# Altium PCB DC-DC_BUCK-BOOST.PcbDoc (part 1 of 3)
Units mm, origin at the board's own origin, x right, y up, seen from the top; angles counter-clockwise.
Board outline 250 x 400 mm, 4 copper layers (Top Layer 1, Top Layer, Bottom Layer, Bottom Layer 1), stack 0.603 mm thick; 332 components, 145 nets, 884 pads, 70 vias.
Unrouted connection lines stored in the file: 20.
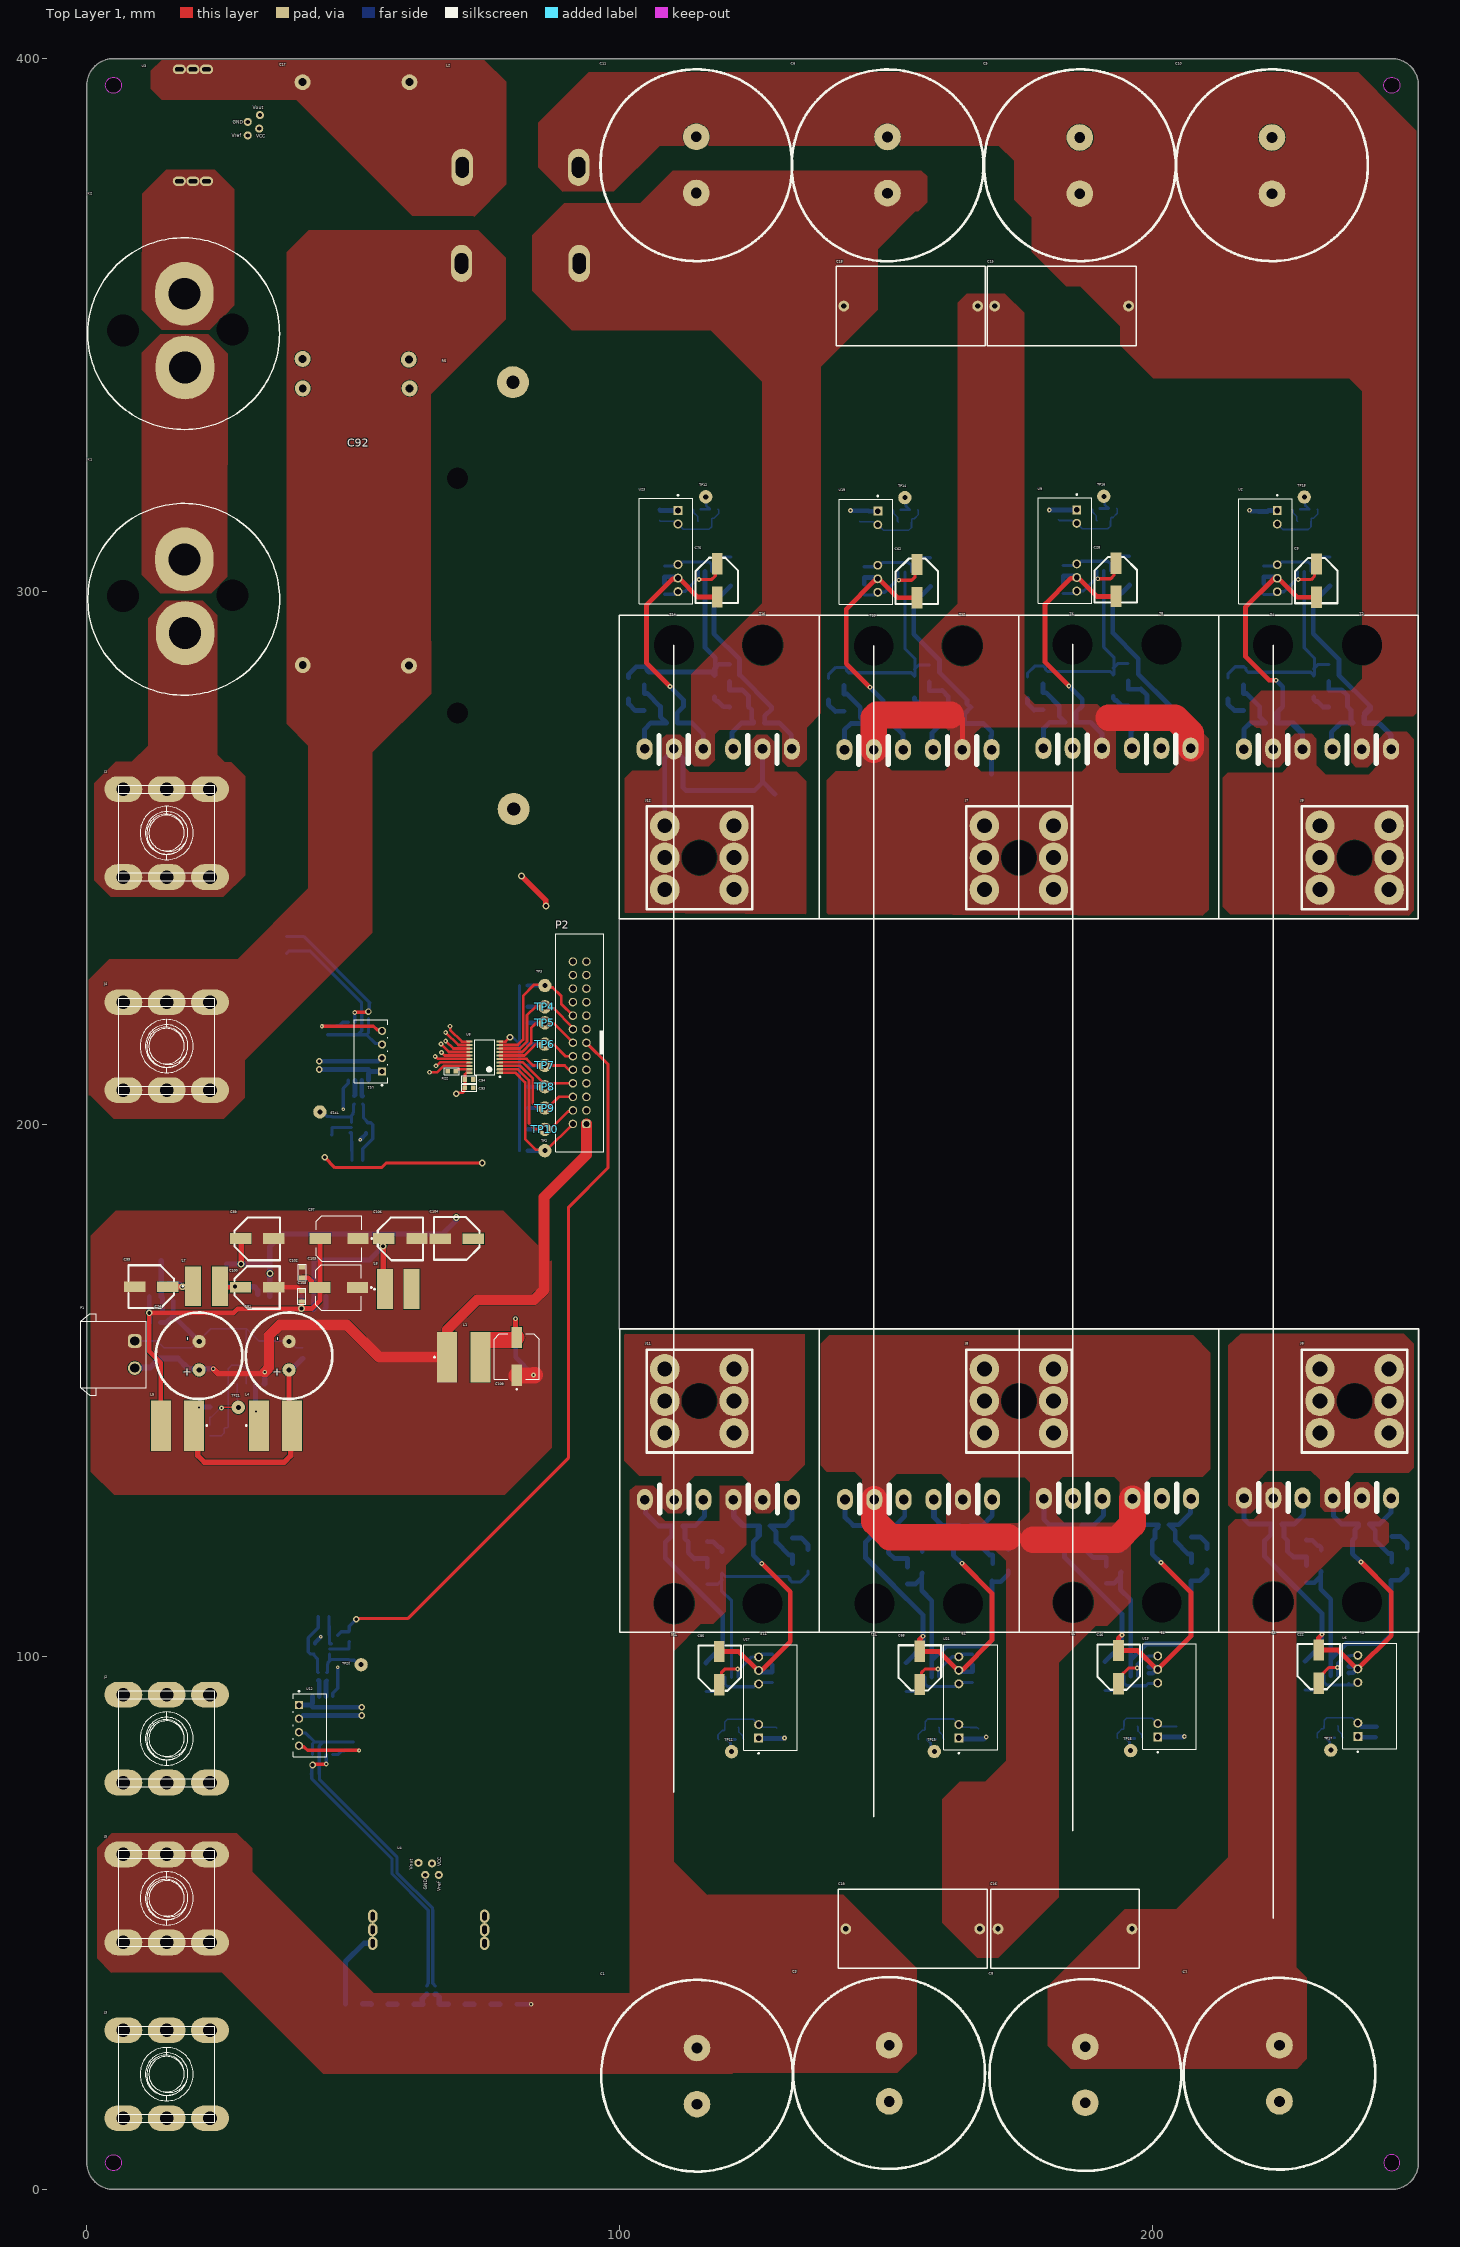
[diagram p0: Top Layer 1 view]
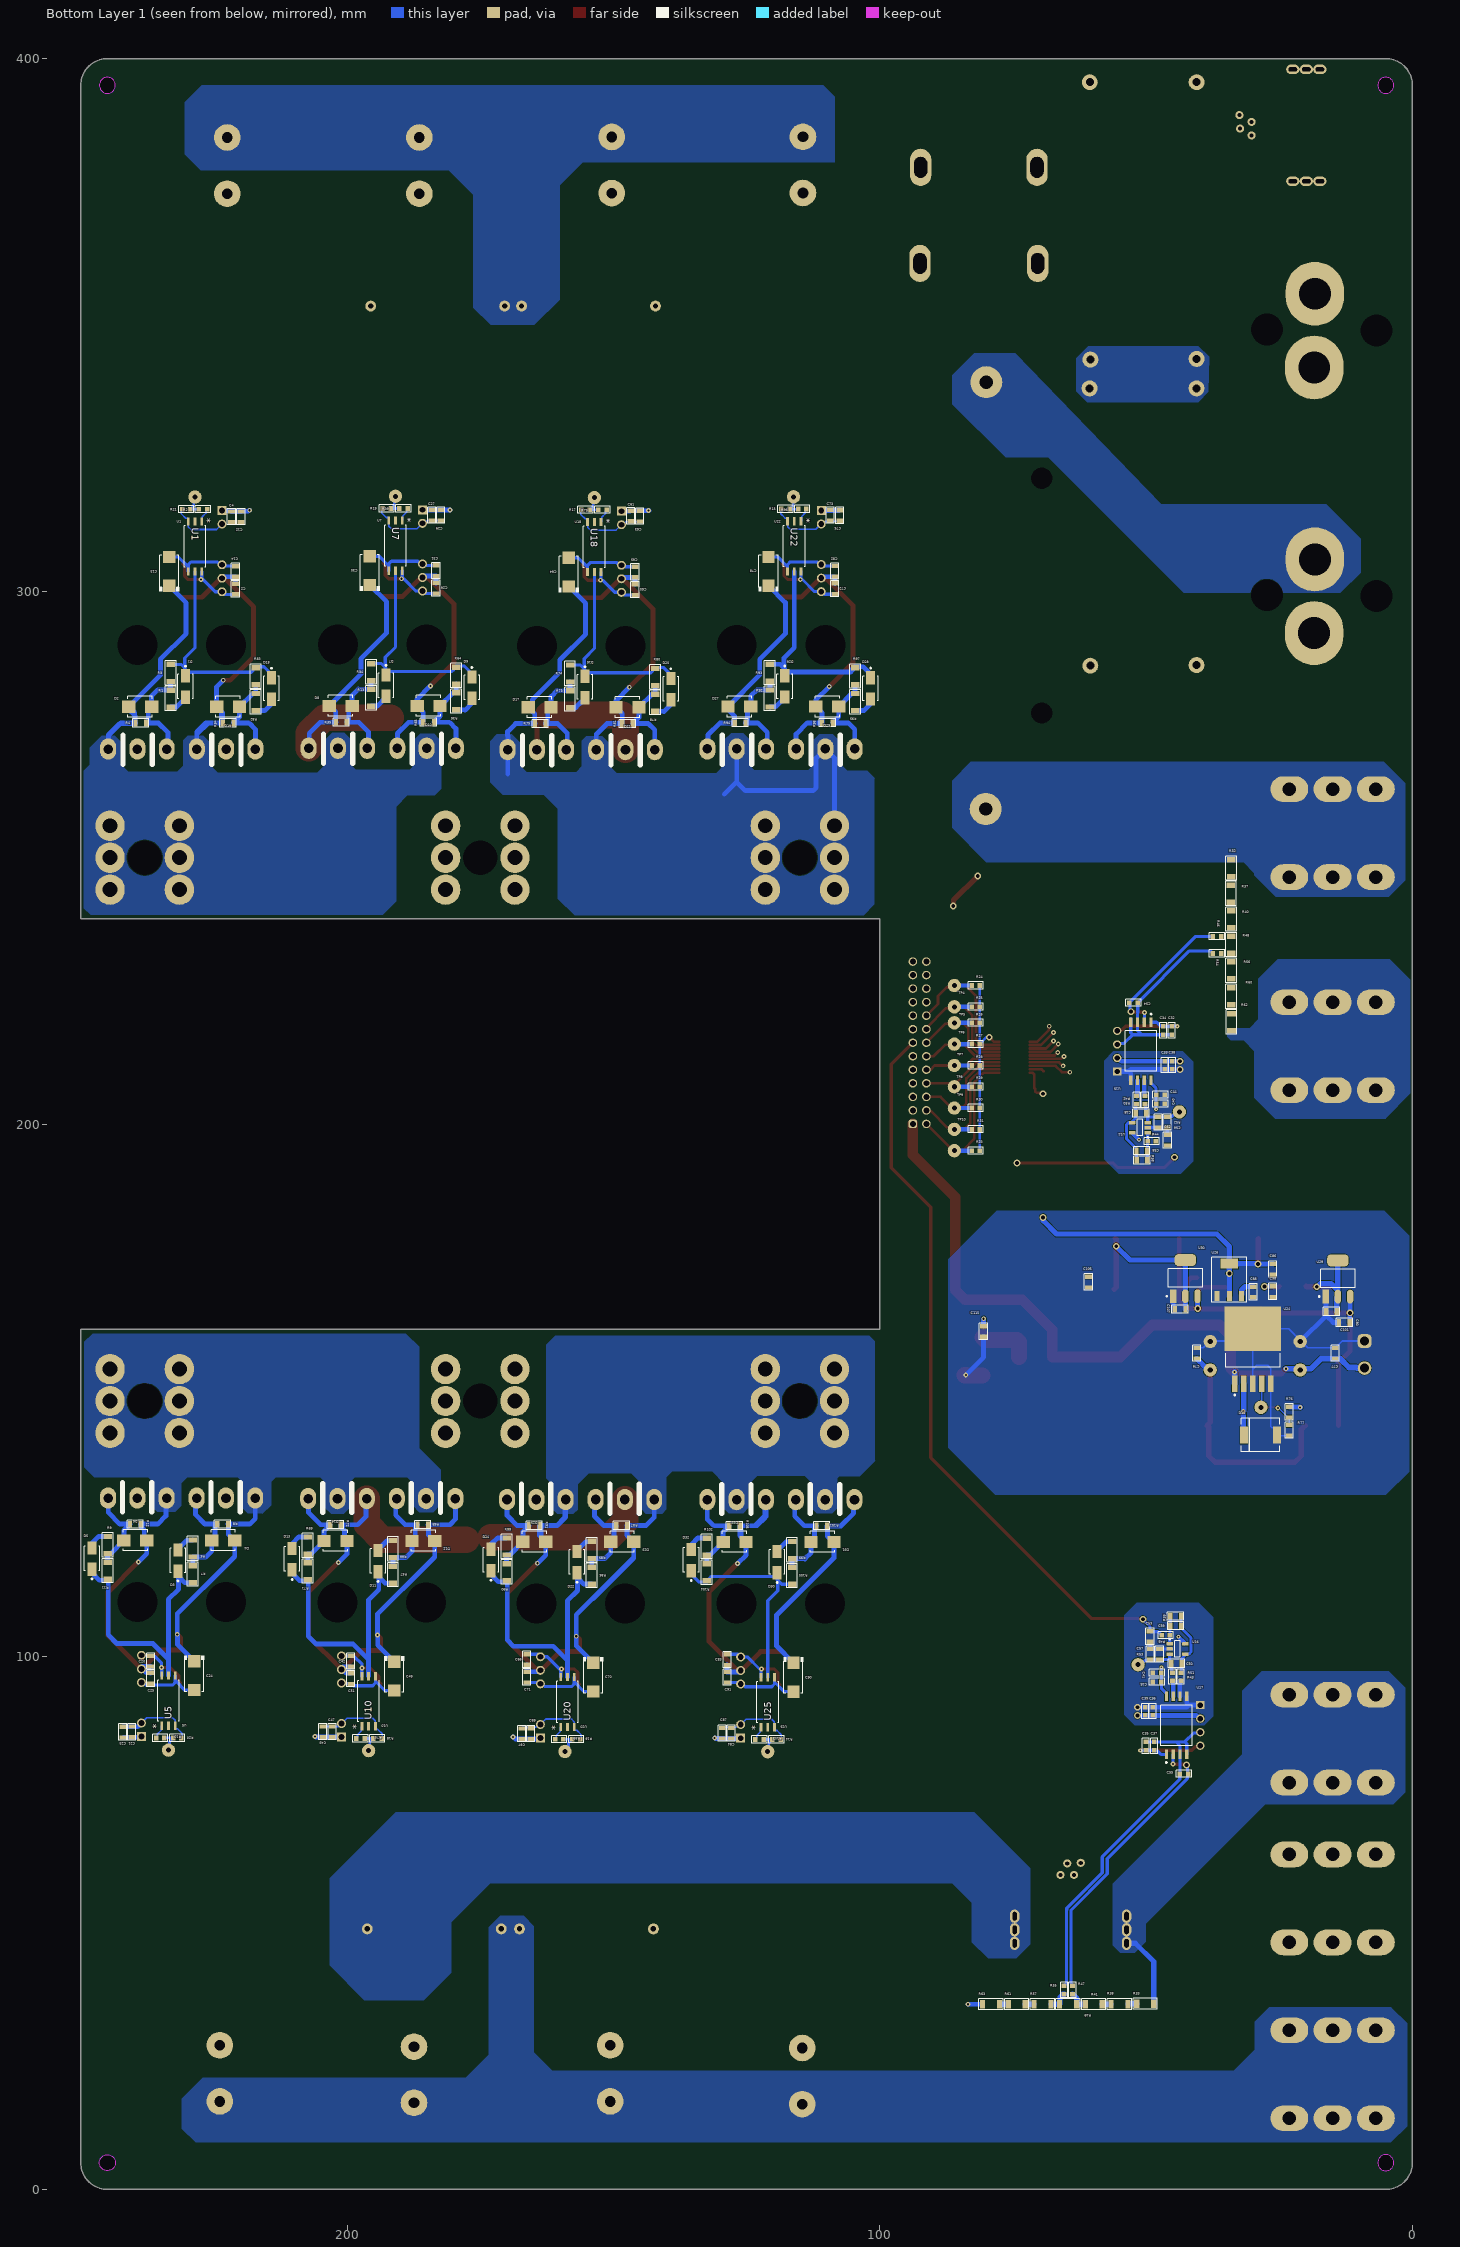
[diagram p1: Bottom Layer 1 view, seen from below]
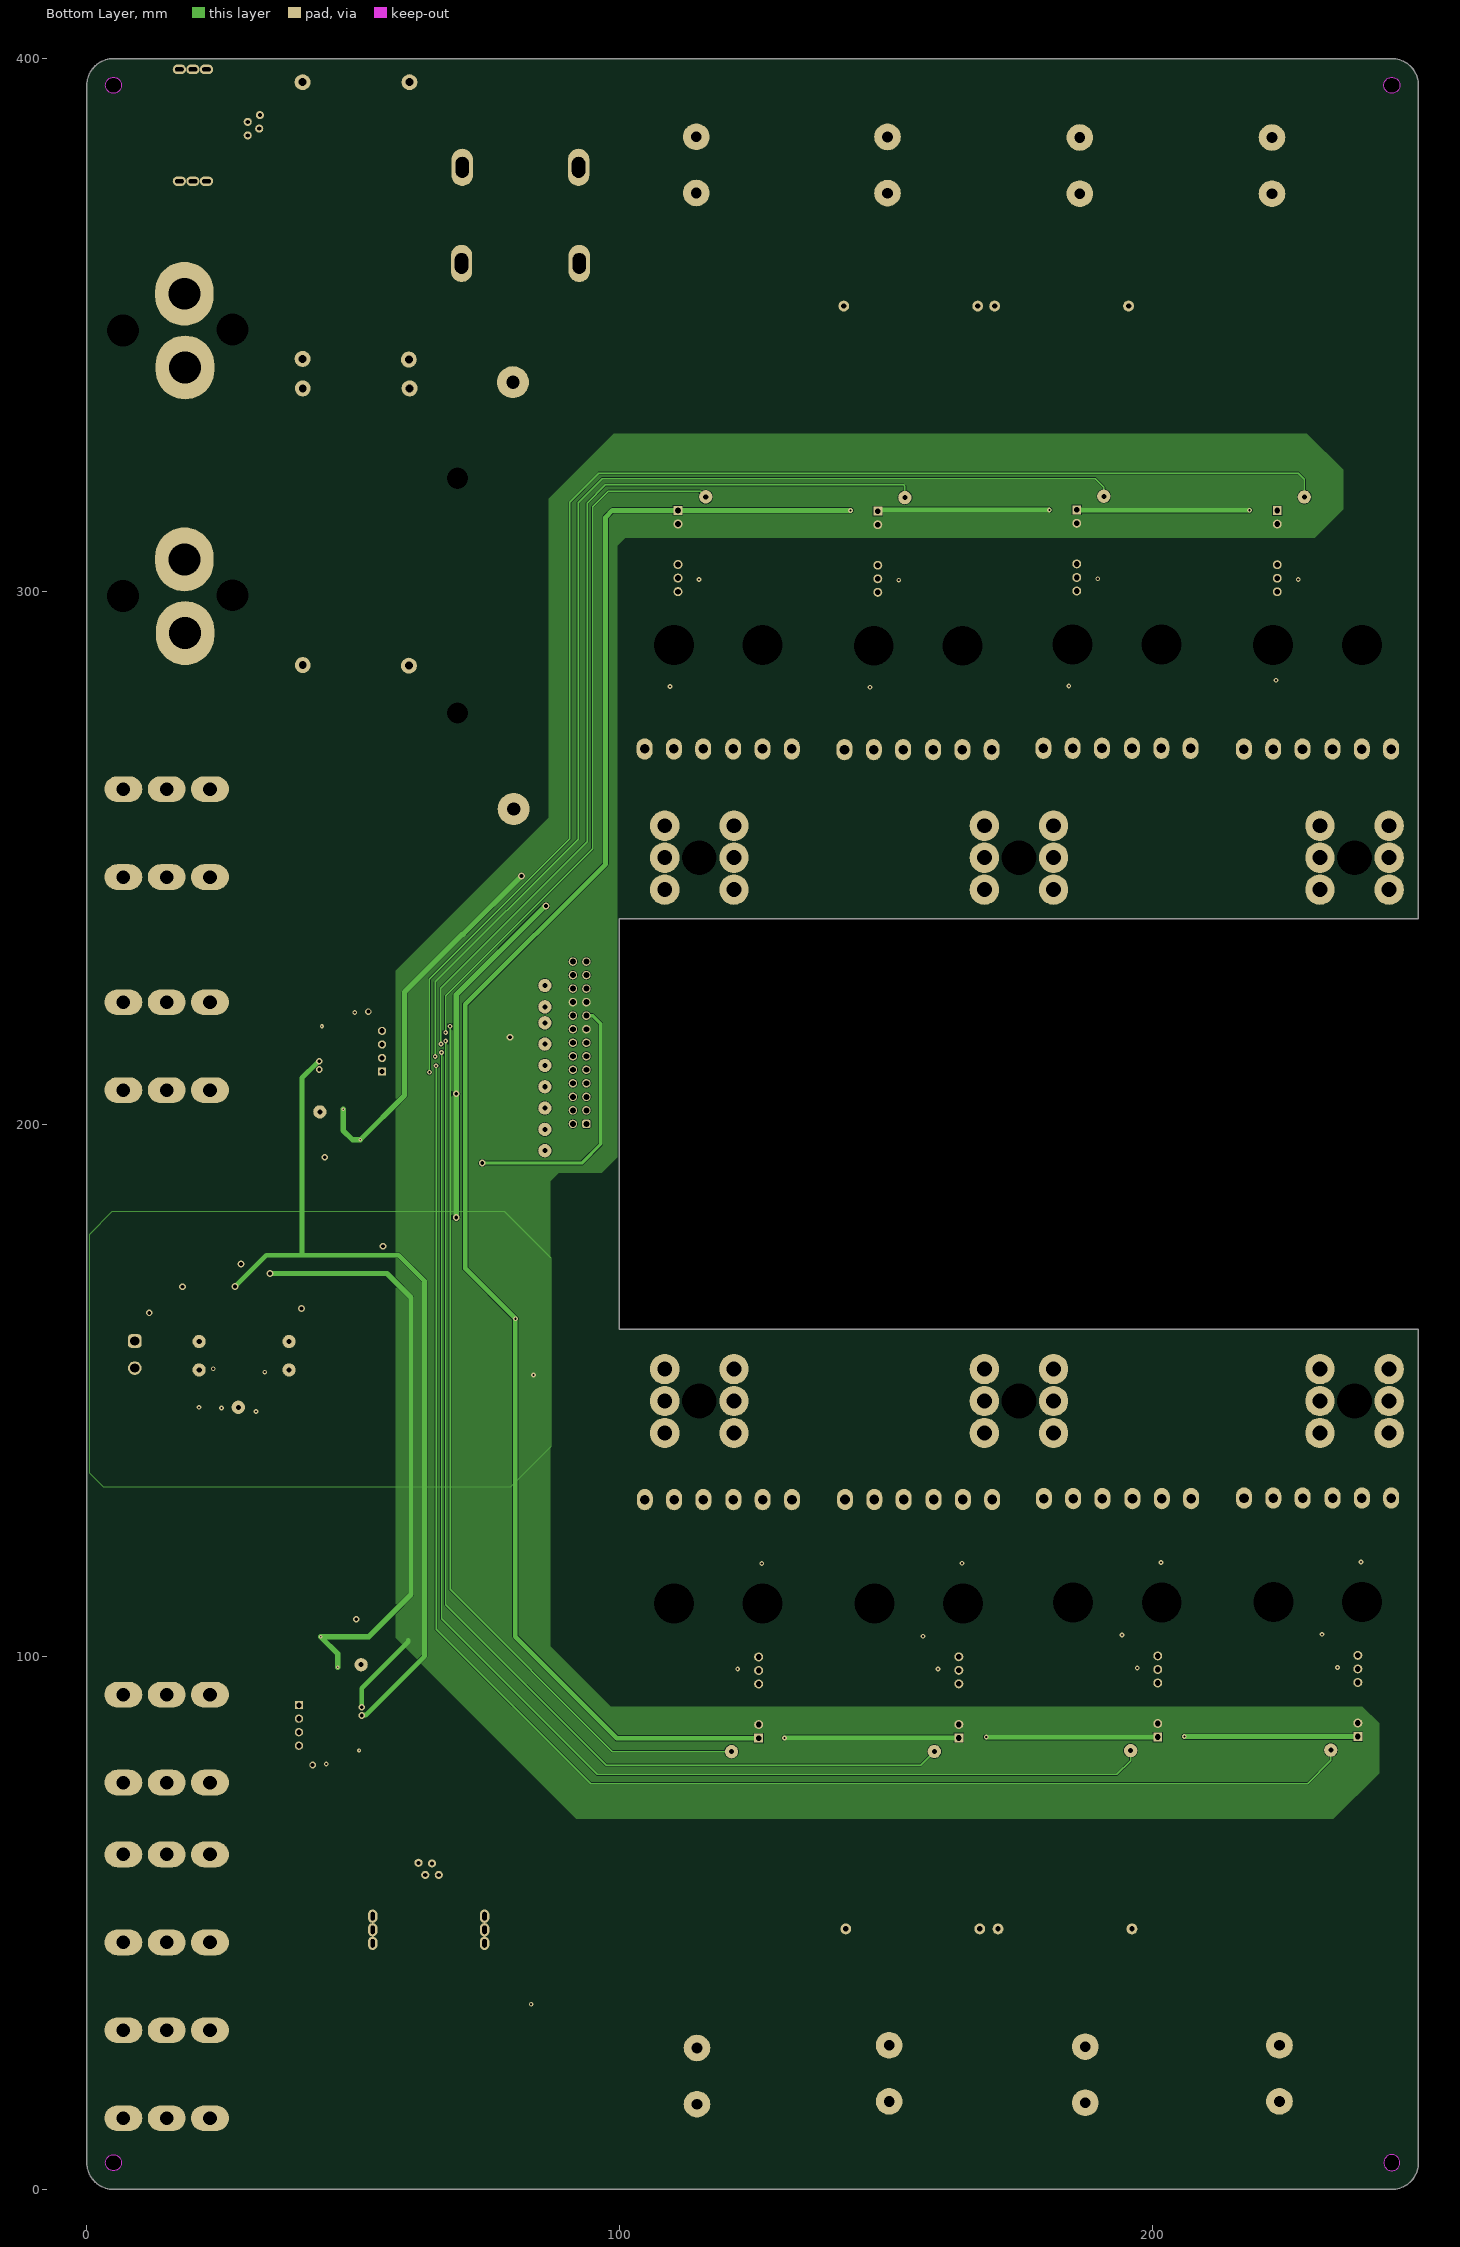
[diagram p2: Bottom Layer]
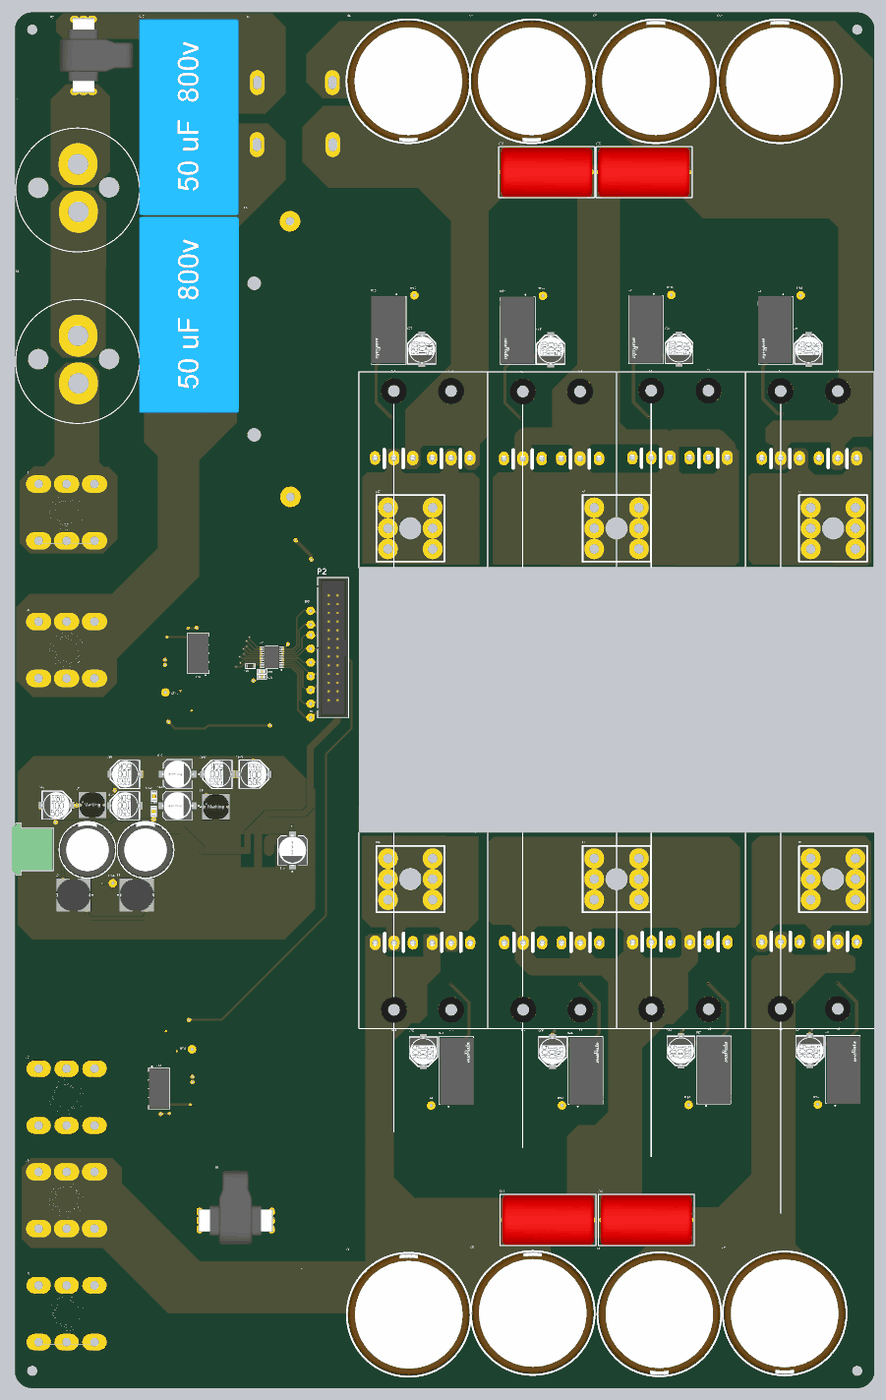
[diagram p5: 3D render of the assembled board from above, using the file's embedded part models]
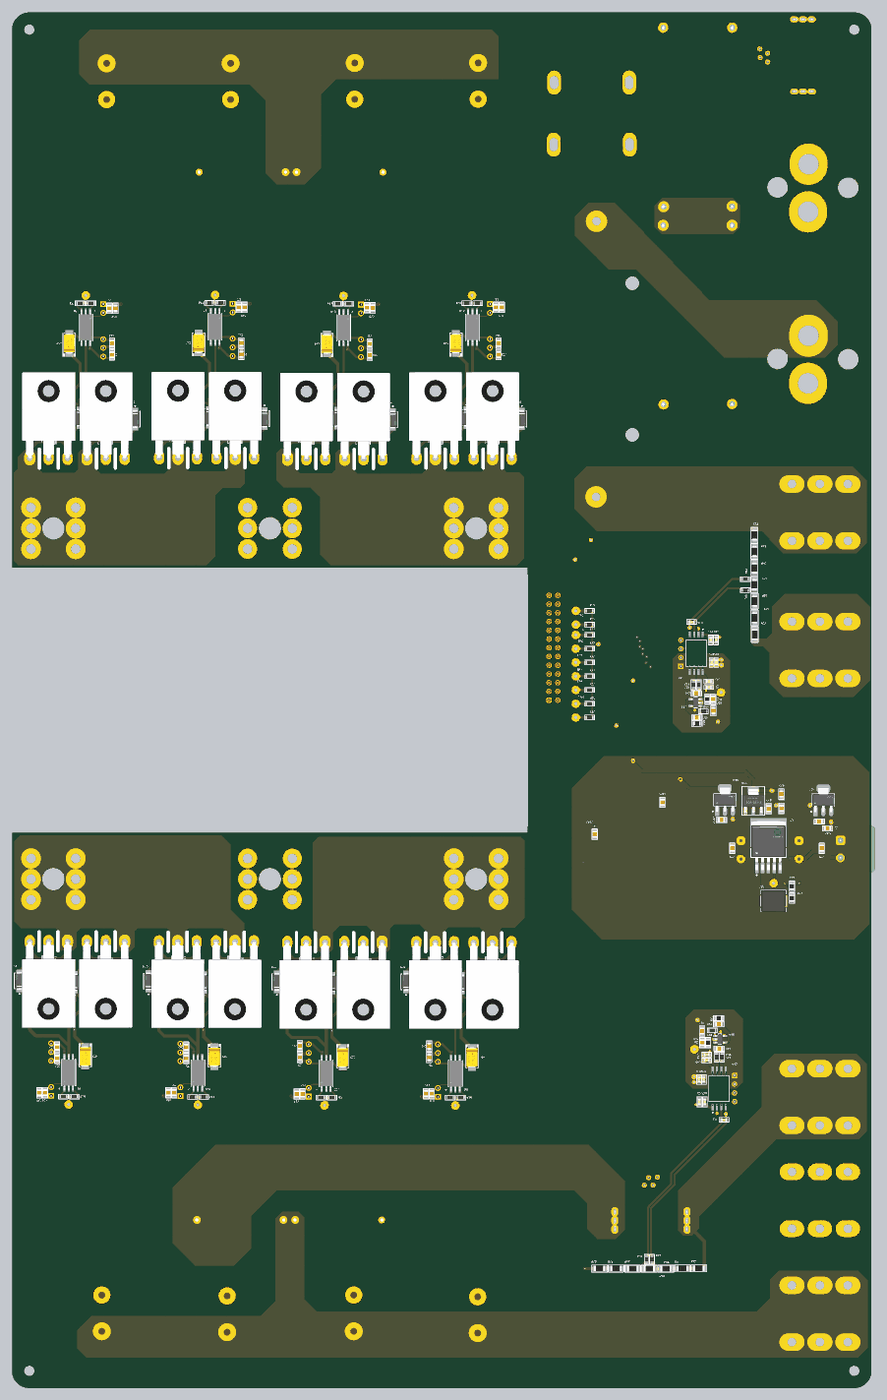
[diagram p6: 3D render of the assembled board from below, using the file's embedded part models]

## Layer stack, top to bottom
Top Solder: solder mask 0.0102, Solder Resist, Dk 3.5
Top Layer 1: signal copper 0.035
Dielectric 2: prepreg 0.0711, PP-006, Dk 4.1
Top Layer: signal copper 0.0356
Dielectric 1: dielectric 0.32, FR-4, Dk 4.8
Bottom Layer: signal copper 0.0356
Dielectric 3: prepreg 0.0711, PP-006, Dk 4.1
Bottom Layer 1: signal copper 0.035
Bottom Solder: solder mask 0.0102, Solder Resist, Dk 3.5

## Board outline
5.006,0.006 cw(c5.006,5.006) 0.006,5.006 0.006,395.006 cw(c5.006,395.006) 5.006,400.006 245.006,400.006 cw(c245.006,395.006) 250.006,395.006 250.006,238.506 100.006,238.506 100.006,161.506 250.006,161.506 250.006,5.006 cw(c245.006,5.006) 245.006,0.006
cut-out: 245.006,393.506 cw(c245.006,395.006) 243.506,395.006 cw(c245.006,395.006) 245.006,396.506 cw(c245.006,395.006) 246.506,395.006 cw(c245.006,395.006)
cut-out: 5.006,393.506 cw(c5.006,395.006) 3.506,395.006 cw(c5.006,395.006) 5.006,396.506 cw(c5.006,395.006) 6.506,395.006 cw(c5.006,395.006)
cut-out: 243.506,5.006 ccw(c245.006,5.006) 245.006,3.506 ccw(c245.006,5.006) 246.506,5.006 ccw(c245.006,5.006) 245.006,6.506 ccw(c245.006,5.006)
cut-out: 5.006,3.506 cw(c5.006,5.006) 3.506,5.006 cw(c5.006,5.006) 5.006,6.506 cw(c5.006,5.006) 6.506,5.006 cw(c5.006,5.006)

## Design rules (kind name [scope] priority, off if disabled: settings)
Clearance [All] p1: gap=0.1 ignorepadtopadclearanceinfootprint=FALSE
DiffPairsRouting [All] p1: maxlimit=0.254 minlimit=0.254 mostfreqgap=0.254 toplayer_minwidth=0.381 toplayer_maxwidth=0.9 toplayer_prefwidth=0.7 midlayer1_minwidth=0.381 midlayer1_maxwidth=0.381 midlayer1_prefwidth=0.381 midlayer2_minwidth=0.381 midlayer2_maxwidth=0.381 midlayer2_prefwidth=0.381 bottomlayer_minwidth=0.381 bottomlayer_maxwidth=0.9 bottomlayer_prefwidth=0.7 maxuncoupledlength=70
Height [All] p1: minheight=0 maxheight=60 prefheight=30
PlaneConnect [All] p1: planeconnectstyle=Direct reliefexpansion=0.508 reliefentries=4 reliefconductorwidth=0.254 reliefairgap=0.254
PolygonConnect [All] p1: connectstyle=Direct reliefconductorwidth=0.254 reliefentries=4 polygonreliefangle="90 Angle" airgapwidth=0.254
RoutingVias [All] p1: holewidth=0.711 width=1.27 viastyle="Through Hole" minholewidth=0.711 minwidth=1.27 maxholewidth=0.711 maxwidth=1.27
SolderMaskExpansion [All] p1: expansion=0.102 istentingtop=FALSE
SupplyNets "Schematic Supply Nets_9" [InNet('+5V_1')] p1: voltage=0.000
SupplyNets "Schematic Supply Nets_8" [InNet('VCC')] p2: voltage=0.000
SupplyNets "Schematic Supply Nets_7" [InNet('GND')] p3: voltage=0.000
SupplyNets "Schematic Supply Nets_6" [InNet('+5')] p4: voltage=0.000
SupplyNets "Schematic Supply Nets_5" [InNet('+8VDC')] p5: voltage=0.000
SupplyNets "Schematic Supply Nets_4" [InNet('+3V3')] p6: voltage=0.000
SupplyNets "Schematic Supply Nets_3" [InNet('+5V')] p7: voltage=0.000
SupplyNets "Schematic Supply Nets_2" [InNet('+12')] p8: voltage=0.000
Width [All] p1: maxlimit=5 minlimit=0.254 preferedwidth=0.5 toplayer_minwidth=0.3 midlayer1_maxwidth=0.254 midlayer1_prefwidth=0.254 midlayer2_prefwidth=0.254 bottomlayer_minwidth=0.3 minimp=50.000000 maximp=50.000000 favimp=50.000000 checkconnectedcopper=TRUE
27 further rules are at their usual default settings.

## Components (designator, comment, footprint, x,y, rotation, side; value= is the part's Value field where it differs from the comment)
C1 "550V_470uF" 500V_470uF 114.554,21.336 r90 top
C2 "0.1uF" CAP-0805 220.949,300.437 r270 bottom
C3 "550V_470uF" 500V_470uF 150.622,21.844 r90 top
C4 "0.01uF" CAP-0805 221.7,314 r90 bottom
C5 "550V_470uF" 500V_470uF 186.436,380 r90 top
C6 "550V_470uF" 500V_470uF 150.325,379.975 r270 top
C7 "550V_470uF" 500V_470uF 223.901,21.717 r270 top
C8 "550V_470uF" 500V_470uF 187.452,21.463 r270 top
C9 "100uF_50V" CAP_SMD_Size_E 230.855,301.961 r90 top
C10 "550V_470uF" 500V_470uF 222.504,380 r90 top
C11 "550V_470uF" 500V_470uF 114.427,380 r270 top
C12 "2.2uF" CAP-0805 219.925,314 r270 bottom
C13 "16V_47uF" CAP-TAN-C 233.395,303.739 r90 bottom
C14 "0.1uF" CAP-0805 220.949,303.739 r270 bottom
C15 "4.7uF_630V" CAP_4.7uF_630V 183.007,353.568 r0 top
C16 "CAP-NON-POLAR" CAP_4.7uF_630V 183.642,48.895 r0 top
C17 "CAP-NON-POLAR" "Z121578672 77G" 50.55,369.55 r90 top
C18 "CAP-NON-POLAR" CAP_4.7uF_630V 154.686,353.568 r0 top
C19 "CAP-NON-POLAR" CAP_4.7uF_630V 155.067,48.895 r0 top
C20 "0.1uF" CAP-0805 236.9,99.15 r90 bottom
C21 "0.01uF" CAP-0805 240.4,85.875 r270 bottom
C22 "100uF_50V" CAP_SMD_Size_E 231.257,98.215 r270 top
C23 "2.2uF" CAP-0805 242.125,85.85 r270 bottom
C24 "16V_47uF" CAP-TAN-C 228.717,96.437 r270 bottom
C25 "0.1uF" CAP-0805 236.9,95.925 r90 bottom
C26 "0.1uF" CAP-0805 183.307,300.579 r270 bottom
C27 "0.01uF" CAP-0805 184.125,314.275 r90 bottom
C28 "100uF_50V" CAP_SMD_Size_E 193.213,302.103 r90 top
C29 "2.2uF" CAP-0805 182.4,314.275 r270 bottom
C30 "16V_47uF" CAP-TAN-C 195.753,303.881 r90 bottom
C31 "0.1uF" CAP-0805 183.307,303.881 r270 bottom
C32 "100nF" CAP-0603 45.21,217.551 r90 bottom
C33 "0.01uF" CAP-0603 46.507,211.026 r90 bottom
C34 "1uF" CAP-0603 46.785,217.551 r90 bottom
C35 "100nF" CAP-0603 50.05,83.225 r270 bottom
C36 "0.01uF" CAP-0603 48.753,89.75 r270 bottom
C37 "1uF" CAP-0603 48.475,83.225 r270 bottom
C38 "2.2uF" CAP-0603 45.11,211.026 r90 bottom
C39 "2.2uF" CAP-0603 50.15,89.75 r270 bottom
C40 "0.01uF" CAP-0603 47.31,203.801 r0 bottom
C41 "0.01uF" CAP-0603 47.95,96.975 r180 bottom
C42 "0.1uF" CAP-0805 199.35,99.125 r90 bottom
C43 "0.01uF" CAP-0805 204.575,85.9 r270 bottom
C44 "2.2uF" CAP-0603 47.31,205.501 r0 bottom
C45 "2.2uF" CAP-0603 47.95,95.275 r180 bottom
C46 "100uF_50V" CAP_SMD_Size_E 193.683,98.115 r270 top
C47 "2.2uF" CAP-0805 202.825,85.9 r90 bottom
C48 "1nF" CAP-0805 50.96,202.051 r180 bottom
C49 "16V_47uF" CAP-TAN-C 191.143,96.337 r270 bottom
C50 "1nF" CAP-0805 44.3,98.725 r0 bottom
C51 "0.1uF" CAP-0805 199.35,95.875 r90 bottom
C52 "10nF" CAP-0805 45.985,196.976 r270 bottom
C53 "10nF" CAP-0805 49.275,103.8 r90 bottom
C54 "4.7nF" CAP-0603 52.36,222.776 r0 bottom
C55 "4.7nF" CAP-0603 42.9,78 r180 bottom
C56 "470pF" CAP-0805 46.035,200.326 r90 bottom
C57 "470pF" CAP-0805 49.225,100.45 r270 bottom
C58 "470pF" CAP-0805 50.81,194.951 r0 bottom
C59 "470pF" CAP-0805 44.45,105.825 r180 bottom
C60 "0.1uF" CAP-0805 145.964,300.327 r270 bottom
C61 "0.01uF" CAP-0805 146.775,314.15 r90 bottom
C62 "100uF_50V" CAP_SMD_Size_E 155.87,301.851 r90 top
C63 "2.2uF" CAP-0805 145.05,314.125 r270 bottom
C64 "16V_47uF" CAP-TAN-C 158.41,303.629 r90 bottom
C65 "0.1uF" CAP-0805 145.964,303.629 r270 bottom
C66 "0.1uF" CAP-0805 166.258,99.474 r90 bottom
C67 "0.01uF" CAP-0805 167.25,85.525 r270 bottom
C68 "100uF_50V" CAP_SMD_Size_E 156.352,97.95 r270 top
C69 "2.2uF" CAP-0805 165.525,85.55 r90 bottom
C70 "16V_47uF" CAP-TAN-C 153.812,96.172 r270 bottom
C71 "0.1uF" CAP-0805 166.258,96.172 r90 bottom
C72 "0.1uF" CAP-0805 108.475,300.5 r270 bottom
C73 "0.01uF" CAP-0805 109.275,314.275 r90 bottom
C74 "25V_1000uF" "HITANO 3300uF 25V  16x25" 21.082,156.5 r90 top
C75 "100uF_50V" CAP_SMD_Size_E 118.349,301.985 r90 top
C76 "2.2uF" CAP-0805 107.55,314.25 r270 bottom
C77 "1uF" CAP-0805 14.478,156.976 r270 bottom
C78 "16V_47uF" CAP-TAN-C 120.889,303.763 r90 bottom
C79 "0.1uF" CAP-0805 40.513,156.976 r270 bottom
C80 "0.1uF" CAP-0805 12.775,162.75 r180 bottom
C81 "25V_1000uF" "HITANO 3300uF 25V  16x25" 37.973,156.5 r90 top
C82 "0.1uF" CAP-0805 108.443,303.763 r270 bottom
C83 "0.1uF" CAP-0805 128.666,99.445 r90 bottom
C84 "0.01uF" CAP-0805 127.875,85.625 r270 bottom
C85 "100uF_50V" CAP_SMD_Size_E 118.76,97.921 r270 top
C86 "0.1uF" CAP-0805 26.225,172.725 r90 bottom
C87 "2.2uF" CAP-0805 129.6,85.625 r90 bottom
C88 "0.1uF" CAP-0805 29.9,168.475 r90 bottom
C89 "1000uF 6.3V" CAP_SMD_Size_E 32.075,178.5 r180 top
C90 "16V_47uF" CAP-TAN-C 116.22,96.143 r270 bottom
C91 "0.1uF" CAP-0805 128.666,96.143 r90 bottom
C92 "CAP-NON-POLAR" "Z121578672 77G" 50.575,312.075 r90 top
C93 "0.01uF" CAP-0603 71.775,206.8 r180 top
C94 "2.2uF" CAP-0603 71.775,208.35 r180 top
C97 "1000uF 10V" CAP_SMD_Size_G 47.35,178.5 r180 top
C98 "0.1uF" CAP-0805 26.2,168.55 r90 bottom
C99 "1000uF 6.3V" CAP_SMD_Size_E 12.023,169.425 r0 top
C100 "1000uF 6.3V" CAP_SMD_Size_E 32.025,169.375 r180 top
C101 "0.1uF" CAP-0805 15.2,164.8 r180 bottom
C102 "0.1uF" CAP-0805 40.425,172.125 r270 top
C103 "1000uF 10V" CAP_SMD_Size_G 47.275,169.325 r180 top
C104 "1000uF 6.3V" CAP_SMD_Size_E 69.4,178.45 r0 top
C105 "0.1uF" CAP-0805 60.825,170.325 r90 bottom
C106 "1000uF 6.3V" CAP_SMD_Size_E 58.95,178.5 r180 top
C107 "0.1uF" CAP-0805 43.625,165.225 r180 bottom
C108 "0.1uF" CAP-0805 40.35,167.675 r270 top
C109 "330uF 25V" CAP_SMD_Size_G 80.7,156.375 r90 top
C110 "1uF" CAP-0805 80.525,161.05 r90 bottom
D1 "US1G" US1G_SMA 230.347,282.149 r270 bottom
D2 "SMBJ15CA-TR" FP-SMB-CA-MFG 238.856,278.339 r180 bottom
D3 "US1G" US1G_SMA 231.765,118.027 r90 bottom
D4 "SMBJ15CA-TR" FP-SMB-CA-MFG 223.256,121.837 r0 bottom
D5 "US1G" US1G_SMA 247.894,118.408 r90 bottom
D6 "SMBJ15CA-TR" FP-SMB-CA-MFG 239.757,121.837 r0 bottom
D7 "US1G" US1G_SMA 192.705,282.291 r270 bottom
D8 "SMBJ15CA-TR" FP-SMB-CA-MFG 201.214,278.481 r180 bottom
D9 "US1G" US1G_SMA 176.576,281.91 r270 bottom
D10 "SMBJ15CA-TR" FP-SMB-CA-MFG 184.713,278.481 r180 bottom
D11 "US1G" US1G_SMA 194.191,117.927 r90 bottom
D12 "SMBJ15CA-TR" FP-SMB-CA-MFG 185.682,121.737 r0 bottom
D13 "US1G" US1G_SMA 210.32,118.308 r90 bottom
D14 "SMBJ15CA-TR" FP-SMB-CA-MFG 202.183,121.737 r0 bottom
D15 "SS36" SMC/DO214AB 28.505,141.609 r180 bottom
D16 "US1G" US1G_SMA 155.362,282.039 r270 bottom
D17 "SMBJ15CA-TR" FP-SMB-CA-MFG 163.871,278.229 r180 bottom
D18 "US1G" US1G_SMA 214.218,281.768 r270 bottom
D19 "SMBJ15CA-TR" FP-SMB-CA-MFG 222.355,278.339 r180 bottom
D20 "US1G" US1G_SMA 139.233,281.658 r270 bottom
D21 "SMBJ15CA-TR" FP-SMB-CA-MFG 147.37,278.229 r180 bottom
D22 "US1G" US1G_SMA 156.86,117.762 r90 bottom
D23 "SMBJ15CA-TR" FP-SMB-CA-MFG 148.351,121.572 r0 bottom
D24 "US1G" US1G_SMA 172.989,118.143 r90 bottom
D25 "SMBJ15CA-TR" FP-SMB-CA-MFG 164.852,121.572 r0 bottom
D26 "US1G" US1G_SMA 117.841,282.173 r270 bottom
D27 "SMBJ15CA-TR" FP-SMB-CA-MFG 126.35,278.363 r180 bottom
D28 "US1G" US1G_SMA 101.712,281.792 r270 bottom
D29 "SMBJ15CA-TR" FP-SMB-CA-MFG 109.849,278.363 r180 bottom
D30 "US1G" US1G_SMA 119.268,117.733 r90 bottom
D31 "SMBJ15CA-TR" FP-SMB-CA-MFG 110.759,121.543 r0 bottom
D32 "US1G" US1G_SMA 135.397,118.114 r90 bottom
D33 "SMBJ15CA-TR" FP-SMB-CA-MFG 127.26,121.543 r0 bottom
J1 "18 * 18MM 180A PCB" "M8 Conn" 15,255 r0 top locked
J2 "18 * 18MM 180A PCB" "M8 Conn" 15,85 r0 top locked
J3 "18 * 18MM 180A PCB" "M8 Conn" 15,22 r0 top locked
J4 "18 * 18MM 180A PCB" "M8 Conn" 15,215 r0 top locked
J5 "18 * 18MM 180A PCB" "M8 Conn" 15,55 r0 top locked
J6 "M5" M5_Conn 238,148 r0 top locked
J7 "M5" M5_Conn 175,250 r0 top locked
J8 "M5" M5_Conn 175,148 r0 top locked
J9 "M5" M5_Conn 238,250 r0 top locked
J11 "M5" M5_Conn 115,148 r0 top locked
J12 "M5" M5_Conn 115,250 r0 top locked
K1 "SEV30ADXL" Relay_1000VDC_30A 18.96,293.427 r0 top
K2 "SEV30ADXL" Relay_1000VDC_30A 18.95,343.3 r0 top
L1 "100uH CD105" WE-PD2_1054#1 1340.775,1426.25 r0 top
L2 "Drossel" T47x27x15 89.408,370.586 r90 top
L4 "100uH CD105" WE-PD2_1054#2 35.433,143.387 r0 top
L5 "100uH CD105" WE-PD2_1054#2 17.018,143.387 r180 top
L7 "220uH CD75" WE-PD2_7850 22.479,169.549 r0 top
L8 "220uH CD75" WE-PD2_7850 58.475,169 r0 top
P1 "691305540002" 691305540002 5,156.722 r270 top locked
P2 "61202621621" 61202621621 92.53,215.265 r90 top
R1 "5" RES-1206 233.141,279.863 r270 bottom
R2 "150" RES-0603 227.045,315.423 r180 bottom
R3 "10" RES-1206 233.141,284.689 r90 bottom
R4 "1K" RES-0805 238.729,275.291 r0 bottom
R5 "100" RES_100W_Aluminium 80,299.275 r90 top
R6 "5" RES-1206 228.971,120.313 r90 bottom
R7 "10" RES-1206 228.971,115.487 r270 bottom
R8 "1K" RES-0805 223.383,124.885 r180 bottom
R9 "5" RES-1206 244.968,120.96 r90 bottom
R10 "150" RES-0603 235.067,84.753 r0 bottom
R11 "10" RES-1206 244.968,116.134 r270 bottom
R12 "1K" RES-0805 239.766,124.885 r180 bottom
R13 "5" RES-1206 195.499,280.005 r270 bottom
R14 "10K" RES-0603 119.395,84.459 r0 bottom
R15 "10K" RES-0603 117.714,315.447 r180 bottom
R16 "10K" RES-0603 156.987,84.488 r0 bottom
R17 "10K" RES-0603 155.235,315.313 r180 bottom
R18 "10K" RES-0603 194.318,84.653 r0 bottom
R19 "10K" RES-0603 192.578,315.565 r180 bottom
R20 "10K" RES-0603 231.892,84.753 r0 bottom
R21 "10K" RES-0603 230.22,315.423 r180 bottom
R22 "10K" RES-0603 68.5,209.925 r0 top
R23 "10K" RES-0603 82,195 r0 bottom locked
R24 "10K" RES-0603 82,226 r0 bottom locked
R25 "10K" RES-0603 82,222 r0 bottom locked
R26 "10K" RES-0603 82,219 r0 bottom locked
R27 "10K" RES-0603 82,215 r0 bottom locked
R28 "10K" RES-0603 82,211 r0 bottom locked
R29 "10K" RES-0603 82,207 r0 bottom locked
R30 "10K" RES-0603 82,203 r0 bottom locked
R31 "10K" RES-0603 82,199 r0 bottom locked
R32 "200K" RES-1206 34.05,248.025 r90 bottom
R33 "200K" RES-1206 50.175,34.825 r180 bottom
R34 "10" RES-1206 195.499,284.831 r90 bottom
R35 "1K" RES-0805 201.087,275.433 r0 bottom
R36 "5" RES-1206 179.502,279.358 r270 bottom
R37 "200K" RES-1206 34.075,243.25 r90 bottom
R38 "200K" RES-1206 55,34.775 r180 bottom
R39 "150" RES-0603 189.403,315.565 r180 bottom
R40 "200K" RES-1206 34.05,238.45 r90 bottom
R41 "200K" RES-1206 59.825,34.725 r180 bottom
R42 "10K" RES-0603 50.21,204.526 r90 bottom
R43 "10K" RES-0603 45.05,96.25 r270 bottom
R44 "100" RES-0603 48.935,196.751 r0 bottom
R45 "100" RES-0603 46.325,104.025 r180 bottom
R46 "100" RES-0603 36.7,235.225 r180 bottom
R47 "100" RES-0603 63.825,37.425 r270 bottom
R48 "2.4K" RES-1206 34.025,233.65 r90 bottom
R49 "2.4K" RES-1206 64.65,34.725 r180 bottom
R50 "10K" RES-0603 51.785,204.526 r90 bottom
R51 "10K" RES-0603 43.475,96.25 r270 bottom
R52 "10K" RES-0805 47.76,200.326 r90 bottom
R53 "10K" RES-0805 47.5,100.45 r270 bottom
R54 "100" RES-0603 36.7,232 r180 bottom
R55 "100" RES-0603 65.4,37.425 r270 bottom
R56 "200K" RES-1206 34,228.85 r90 bottom
R57 "200K" RES-1206 69.45,34.725 r180 bottom
R58 "10K" RES-0805 50.785,193.201 r0 bottom
R59 "10K" RES-0805 44.475,107.575 r180 bottom
R60 "200K" RES-1206 34,223.975 r90 bottom
R61 "200K" RES-1206 74.3,34.75 r180 bottom
R62 "200K" RES-1206 33.975,219.125 r90 bottom
R63 "200K" RES-1206 79.125,34.75 r180 bottom
R64 "10" RES-1206 179.502,284.184 r90 bottom
R65 "1K" RES-0805 184.704,275.433 r0 bottom
R66 "5" RES-1206 191.397,120.213 r90 bottom
R67 "10" RES-1206 191.397,115.387 r270 bottom
R68 "1K" RES-0805 185.809,124.785 r180 bottom
R69 "5" RES-1206 207.394,120.86 r90 bottom
R70 "150" RES-0603 197.493,84.653 r0 bottom
R71 "10" RES-1206 207.394,116.034 r270 bottom
R72 "1K" RES-0805 202.192,124.785 r180 bottom
R73 "5" RES-1206 158.156,279.753 r270 bottom
R74 "10" RES-1206 158.156,284.579 r90 bottom
R75 "1K" RES-0805 163.744,275.181 r0 bottom
R76 "11K" RES-0805 23.114,145.927 r90 bottom
R77 "2K" RES-0805 23.114,142.498 r90 bottom
R78 "5" RES-1206 142.159,279.106 r270 bottom
R79 "150" RES-0603 152.06,315.313 r180 bottom
R80 "10" RES-1206 142.159,283.932 r90 bottom
R81 "1K" RES-0805 147.361,275.181 r0 bottom
R82 "5" RES-1206 217.144,279.216 r270 bottom
R83 "10" RES-1206 217.144,284.042 r90 bottom
R84 "1K" RES-0805 222.346,275.291 r0 bottom
R85 "5" RES-1206 154.066,120.048 r90 bottom
R86 "10" RES-1206 154.066,115.222 r270 bottom
R87 "1K" RES-0805 148.478,124.62 r180 bottom
R88 "5" RES-1206 170.063,120.695 r90 bottom
R89 "150" RES-0603 160.162,84.488 r0 bottom
R90 "10" RES-1206 170.063,115.869 r270 bottom
R91 "1K" RES-0805 164.861,124.62 r180 bottom
R92 "5" RES-1206 120.635,279.887 r270 bottom
R93 "10" RES-1206 120.635,284.713 r90 bottom
R94 "1K" RES-0805 126.223,275.315 r0 bottom
R95 "5" RES-1206 104.638,279.24 r270 bottom
R96 "150" RES-0603 114.539,315.447 r180 bottom
R97 "10" RES-1206 104.638,284.066 r90 bottom
R98 "1K" RES-0805 109.84,275.315 r0 bottom
R99 "5" RES-1206 116.474,120.019 r90 bottom
R100 "10" RES-1206 116.474,115.193 r270 bottom
R101 "1K" RES-0805 110.886,124.591 r180 bottom
R102 "5" RES-1206 132.471,120.666 r90 bottom
R103 "150" RES-0603 122.57,84.459 r0 bottom
R104 "10" RES-1206 132.471,115.84 r270 bottom
R105 "1K" RES-0805 127.269,124.591 r180 bottom
T1 "C3M0022120D" TO-247-3(BEND2) 239.385,110.28 r180 top
T2 "C3M0022120D" TO-247-3(BEND2) 239.364,289.896 r0 top
T3 "C3M0022120D" TO-247-3(BEND2) 222.748,110.28 r180 top
T4 "C3M0022120D" TO-247-3(BEND2) 222.727,289.896 r0 top
T5 "C3M0022120D" TO-247-3(BEND2) 201.811,110.18 r180 top
T6 "C3M0022120D" TO-247-3(BEND2) 185.085,290.038 r0 top
T7 "C3M0022120D" TO-247-3(BEND2) 185.174,110.18 r180 top
T8 "C3M0022120D" TO-247-3(BEND2) 201.722,290.038 r0 top
T9 "C3M0022120D" TO-247-3(BEND2) 164.48,110.015 r180 top
T10 "C3M0022120D" TO-247-3(BEND2) 147.742,289.786 r0 top
T11 "C3M0022120D" TO-247-3(BEND2) 147.843,110.015 r180 top
T12 "C3M0022120D" TO-247-3(BEND2) 164.379,289.786 r0 top
T13 "C3M0022120D" TO-247-3(BEND2) 126.888,109.986 r180 top
T14 "C3M0022120D" TO-247-3(BEND2) 110.221,289.92 r0 top
T15 "C3M0022120D" TO-247-3(BEND2) 110.251,109.986 r180 top
T16 "C3M0022120D" TO-247-3(BEND2) 126.858,289.92 r0 top
TP2 "Test_Point_PCB" Test_Point#1 86.725,193.75 r0 top
TP3 "Test_Point_PCB" Test_Point#2 85.094,226.475 r0 top
TP4 "Test_Point_PCB" Test_Point#3 85.077,222.4 r180 top
TP5 "Test_Point_PCB" Test_Point#4 84.698,218.325 r180 top
TP6 "Test_Point_PCB" Test_Point#5 84.873,214.95 r180 top
TP7 "Test_Point_PCB" Test_Point#6 85.046,210.9 r180 top
TP8 "Test_Point_PCB" Test_Point#7 85.375,206.65 r180 top
TP9 "Test_Point_PCB" Test_Point#8 85.3,203.25 r180 top
TP10 "Test_Point_PCB" Test_Point#9 85.375,199.825 r90 top
TP11 "Test_Point_PCB" Test_Point#10 121.046,82.173 r270 top
TP12 "Test_Point_PCB" Test_Point#10 116.2,317.75 r90 top
TP13 "Test_Point_PCB" Test_Point#10 159.113,82.202 r270 top
TP14 "Test_Point_PCB" Test_Point#10 153.584,317.599 r90 top
TP15 "Test_Point_PCB" Test_Point#10 195.969,82.367 r270 top
TP16 "Test_Point_PCB" Test_Point#10 190.927,317.851 r90 top
TP17 "Test_Point_PCB" Test_Point#10 233.543,82.467 r270 top
TP18 "Test_Point_PCB" Test_Point#10 228.569,317.709 r90 top
TP19 "Test_Point_PCB" Test_Point#10 43.76,202.276 r270 top
TP20 "Test_Point_PCB" Test_Point#10 51.5,98.5 r90 top
TP21 "" Test_Point#10 28.448,146.816 r90 top
U1 "TLP5754" SO6L_TOS 228.569,308.438 r270 bottom
U2 "MGJ2D121505SC" FP-MGJ2D121505SC-MFG 221.259,307.549 r270 top
U3 "STK-PL50A" STK-PL50A 19.925,387.5 r0 top
U4 "STK-PL50A" STK-PL50A 64.175,48.735 r90 top
U5 "TLP5754" SO6L_TOS 233.543,91.738 r90 bottom
U6 "MGJ2D121505SC" FP-MGJ2D121505SC-MFG 240.853,92.627 r90 top
U7 "TLP5754" SO6L_TOS 190.927,308.58 r270 bottom
U8 "SN74LVC541APWR" PW0020A_L 74.7,212.55 r180 top
U9 "MGJ2D121505SC" FP-MGJ2D121505SC-MFG 183.617,307.691 r270 top
U10 "TLP5754" SO6L_TOS 195.969,91.638 r90 bottom
U11 "B0505S-1W" B0505S-1W 53.335,213.676 r90 top
U12 "B0505S-1W" B0505S-1W 41.925,87.1 r270 top
U13 "MGJ2D121505SC" FP-MGJ2D121505SC-MFG 203.279,92.527 r90 top
U14 "OPA320AIDBVT" DBV0005A_M 51.16,199.326 r0 bottom
U15 "AMC1311B" FP-DWV0008A-MFG 50.975,213.675 r270 bottom
U16 "OPA320AIDBVT" DBV0005A_M 44.1,101.45 r180 bottom
U17 "AMC1311B" FP-DWV0008A-MFG 44.285,87.101 r90 bottom
U18 "TLP5754" SO6L_TOS 153.584,308.328 r270 bottom
U19 "MGJ2D121505SC" FP-MGJ2D121505SC-MFG 146.274,307.439 r270 top
U20 "TLP5754" SO6L_TOS 158.638,91.473 r90 bottom
U21 "MGJ2D121505SC" FP-MGJ2D121505SC-MFG 165.948,92.362 r90 top
U22 "TLP5754" SO6L_TOS 116.063,308.462 r270 bottom
U23 "MGJ2D121505SC" FP-MGJ2D121505SC-MFG 108.753,307.573 r270 top
U24 "LM2576HVS-ADJ" ON_Semiconductor_936A-02_MFG 29.972,157.738 r180 bottom
U25 "TLP5754" SO6L_TOS 121.046,91.444 r90 bottom
U26 "AMS1117-3v3" SOT-223-3 34.375,170.749 r180 bottom
U27 "MGJ2D121505SC" FP-MGJ2D121505SC-MFG 128.356,92.333 r90 top
U29 "AMS1117-5V1" SOT-223 14,171 r180 bottom
U30 "AMS1117-5V1" SOT-223 42.64,171.07 r180 bottom

## Footprints (in the part's own frame and the unit in brackets; to place one, negate y for a bottom-side part, rotate by r counter-clockwise, add the part's x,y. Pads: shape width x height; smd on the part's side, far side on the other; paste and mask are expansions set on the pad)
500V_470uF [mm]
  round 5 hole 2: 1(-5.334,0) 2(5.207,0)
  silkscreen extent -18,-18 18,18, body extent -17.6,-17.6 17.61,17.61, height 59.97
61202621621 [mm] "26 pins, straight, gold plating"
  rrect50% 1.6x1.6 hole 1.1: 1(-15.24,-1.27)
  round 1.6 hole 1.1: 2(-15.24,1.27) 3(-12.7,-1.27) 4(-12.7,1.27) 5(-10.16,-1.27) 6(-10.16,1.27) 7(-7.62,-1.27) 8(-7.62,1.27) 9(-5.08,-1.27) 10(-5.08,1.27) 11(-2.54,-1.27) 12(-2.54,1.27) 13(0,-1.27) 14(0,1.27) 15(2.54,-1.27) 16(2.54,1.27) 17(5.08,-1.27) 18(5.08,1.27) 19(7.62,-1.27) 20(7.62,1.27) 21(10.16,-1.27) 22(10.16,1.27) 23(12.7,-1.27) 24(12.7,1.27) 25(15.24,-1.27) 26(15.24,1.27)
  silkscreen extent -20.44,-4.5 20.44,4.5, body extent -20.34,-4.42 20.34,4.75, height 9.13
691305540002 [mm] "5,08mm - PCB Header Horizontal Entry with Plastic Latches - 02p"
  rrect50% 2.55x2.55 hole 1.7: 1(-2.54,4)
  round 2.55 hole 1.7: 2(2.54,4)
  silkscreen extent -7.65,-6.15 7.65,6.15, body extent -7.48,-6 7.48,6, height 8.63
B0505S-1W [mm]
  rect 1.55x1.55 hole 1 paste-2539.97 mask+0: 1(-3.81,-2.1)
  round 1.55 hole 1 paste-2539.97 mask+0: 2(-1.27,-2.1) 3(1.27,-2.1) 4(3.81,-2.1)
  silkscreen extent -6.52,-3.13 5.92,3.13, body extent -6.02,-3.22 6.02,3.22, height 0.25
CAP-0603 [mm]
  rect 0.85x0.9 smd: 1(-0.775,0) 2(0.775,0)
  silkscreen extent -1.43,-0.67 1.43,0.67, body extent -0.8,-0.4 0.8,0.4, height 0.8
CAP-0805 [mm]
  rect 0.8x1.25 smd mask+0.015: 1(-1,0) 2(1,0)
  silkscreen extent -1.52,-0.76 1.52,0.76, body extent -1,-0.62 1,0.63, height 0.8
CAP-TAN-C [mm]
  rect 2.3x2.3 smd: 1(-2.7,0) 2(2.7,0)
  silkscreen extent -3.8,-1.9 3,1.9, body extent -2.9,-1.6 2.9,1.6, height 2.6
CAP_4.7uF_630V [mil]
  round 80 hole 40: 1(-495,0) 2(495,0)
  silkscreen extent -550,-292 550,292, body extent -527,-289 527,289, height 1242
CAP_SMD_Size_E [mm]
  rect 4x2 smd: 1(3.175,0) 2(-3.048,0)
  silkscreen extent -4.19,-3.94 4.32,4.06, body extent -4.25,-4 4.25,4, height 10.59
CAP_SMD_Size_G [mm]
  rect 4x2 smd paste+0 mask+0: 1(3.55,0) 2(-3.55,0)
  silkscreen extent -6.28,-4.25 4.25,4.25, body extent -5.8,-4.5 5.8,4.5, height 0.25
DBV0005A_M [mm] "SOT23, 5-Leads, Body 3.05x1.75mm, Pitch 0.95mm, IPC Low Density"
  rrect15% 1.2x0.65 smd: 1(-1.475,0.95) 2(-1.475,0) 3(-1.475,-0.95) 4(1.475,-0.95) 5(1.475,0.95)
  silkscreen extent -1.6,-1.55 0.5,1.95, body extent -1.42,-1.46 1.42,1.46, height 1.08
FP-DWV0008A-MFG [mm]
  rect 1.8x0.6 smd paste+0 mask+0: 1(-5.45,1.905) 2(-5.45,0.635) 3(-5.45,-0.635) 4(-5.45,-1.905) 5(5.45,-1.905) 6(5.45,-0.635) 7(5.45,0.635) 8(5.45,1.905)
  silkscreen extent -7.1,-2.98 3.8,2.98, body extent -5.75,-2.93 5.75,2.93, height 2.8
FP-MGJ2D121505SC-MFG [mm]
  rect 1.675x1.675 hole 1.075 paste-2539.97 mask+0: 1(-7.62,2.23)
  round 1.675 hole 1.075 paste-2539.97 mask+0: 2(-5.08,2.23) 5(2.54,2.23) 6(5.08,2.23) 7(7.62,2.23)
  silkscreen extent -10.6,-5.02 9.87,5.02, body extent -9.97,-5.13 9.97,5.13, height 0.25
FP-SMB-CA-MFG [mm]
  rect 2.5x2.3 smd paste+0 mask+0: 1(-2.15,0) 2(2.15,0)
  silkscreen extent -2.28,-1.97 2.28,1.97, body extent -2.65,-1.81 2.65,1.81, height 2.5
"HITANO 3300uF 25V  16x25" [mm]
  round 2.5 hole 1: 1(-2.667,0) 2(2.667,0)
  silkscreen extent -8.12,-8.12 8.12,8.12, body extent -8.15,-8.14 8.16,8.16, height 25.87
M5_Conn [mm]
  round 1.524 hole 6.5: 0(0,0)
  oval 5.5x5.7 hole 2.8: 1(-6.5,-6) 1(-6.5,0) 1(-6.5,6) 1(6.5,-6) 1(6.5,0) 1(6.5,6)
  silkscreen extent -9.91,-9.65 9.91,9.65, body extent -7.25,-7.1 7.25,7.1, height 5.5
"M8 Conn" [mil] "M8 Conn"
  oval 280x190 hole 100: 1(-320,-340) 1(-320,310) 1(0,-340) 1(0,310) 1(320,-340) 1(320,310)
  silkscreen extent -355,-369 354,340, body extent -355,-369 354,340, height 500
ON_Semiconductor_936A-02_MFG [mm]
  rect 1.016x3.05 smd paste+0 mask+0: 1(-3.404,-6.485) 2(-1.702,-6.485) 3(0,-6.485) 4(1.702,-6.485) 5(3.404,-6.485)
  rect 10.66x8.38 smd paste+0 mask+0: 6(0,3.82)
  silkscreen extent -5.12,-8.72 5.12,-0.75, body extent -5.01,-7.11 5.01,7.14, height 4.83
PW0020A_L [mm] "SOP, 20-Leads, Body 6.6x4.5mm, Pitch 0.65mm, IPC High Density"
  rrect25% 1.2x0.4 smd: 1(-2.85,2.925) 2(-2.85,2.275) 3(-2.85,1.625) 4(-2.85,0.975) 5(-2.85,0.325) 6(-2.85,-0.325) 7(-2.85,-0.975) 8(-2.85,-1.625) 9(-2.85,-2.275) 10(-2.85,-2.925) 11(2.85,-2.925) 12(2.85,-2.275) 13(2.85,-1.625) 14(2.85,-0.975) 15(2.85,-0.325) 16(2.85,0.325) 17(2.85,0.975) 18(2.85,1.625) 19(2.85,2.275) 20(2.85,2.925)
  silkscreen extent -2.98,-3.3 1.85,3.8, body extent -3.21,-3.25 3.21,3.25, height 1
Relay_1000VDC_30A [mm] "Relay_1000VDC_30A"
  round 4 hole 6: 0(-12.192,5.715) 0(8.382,5.842)
  oval 11x12 hole 6: 1(-0.635,12.573) 2(-0.508,-1.27)
  silkscreen extent -18.76,-12.92 17.24,23.08, body extent -17.24,-19.09 16.26,30.52, height 52
RES-0603 [mm]
  rect 0.85x0.9 smd: 1(-0.775,0) 2(0.775,0)
  silkscreen extent -1.43,-0.67 1.43,0.67, body extent -0.85,-0.45 0.85,0.45, height 0.55
RES-0805 [mm]
  rect 0.8x1.25 smd mask+0.015: 1(-1,0) 2(1,0)
  silkscreen extent -1.52,-0.76 1.52,0.76, body extent -1,-0.62 1,0.63, height 0.6
RES-1206 [mm]
  rect 1x1.6 smd: 1(-1.6,0) 2(1.6,0)
  silkscreen extent -2.29,-1.02 2.29,1.02, body extent -1.6,-0.8 1.6,0.8, height 0.6
RES_100W_Aluminium [mm]
  round 3 hole 4: 0(-22.098,10.414) 0(21.971,10.414)
  round 6 hole 2.5: 1(-40.132,-0.127) 2(40.005,0)
  body extent -43.07,-7.58 42.93,13.42, height 15.36
SMC/DO214AB [mm]
  rect 1.52x3.2 smd: 1(-3.105,0) 2(3.105,0)
  silkscreen extent -3.6,-3.15 3.6,3.15, body extent -3.77,-3.11 3.77,3.11, height 2.62
SO6L_TOS [mil] "SO6L_TOS"
  rect 60x21 smd paste+0 mask+0: 1(-185,50) 2(-185,0) 3(-185,-50) 4(185,-50) 5(185,0) 6(185,50)
  silkscreen extent -153,-81 153,81, body extent -201,-76 201,76, height 87
SOT-223 [mm]
  rect 1.2x2.6 smd paste+0 mask+0: 1(-2.29,-3.395)
  rrect100% 1.2x2.6 smd paste+0 mask+0: 2(0,-3.395) 3(2.29,-3.395)
  rrect59% 4x2.2 smd paste+0 mask+0: 2(0,3.395)
  silkscreen extent -3.63,-3.52 3.25,1.75, body extent -3.25,-3.53 3.25,3.53, height 1.8
SOT-223-3 [mm]
  rect 0.95x1.9 smd: 1(-2.3,-3.05) 2(0,-3.05) 3(2.3,-3.05)
  rect 3.25x1.9 smd: 2(0,3.05)
  silkscreen extent -3.3,-4.2 3.3,4.2, body extent -3.25,-3.5 3.25,3.5, height 1.7
STK-PL50A [mm] "STK-PL50A"
  round 1.524 hole 0.762: 1(10.287,-1.905) 2(12.573,1.905) 3(10.287,0.635) 4(12.446,-0.635)
  oval 2.5x1.8 hole 0.8 slot 1.6 at 0 deg: 5(2.54,10.5) 6(0,10.5) 7(-2.54,10.5) 8(-2.54,-10.5) 9(0,-10.5) 10(2.54,-10.5)
  body extent -7.07,-10.77 14.53,10.83, height 14.8
T47x27x15 [mm] "T47x27x15"
  oval 7x4 hole 2.5 slot 3.9 at 0 deg: 1(-9.017,19.05) 2(-9.017,-3.048) 3(9.017,18.923) 4(9.017,-2.921)
  body extent -27.5,-7.07 27.31,22.07, height 50.02
Test_Point#1 [mm]
  round 2.5 hole 0.95: 1(-0.725,1.25)
Test_Point#2 [mm]
  round 2.5 hole 0.95: 1(0.906,-0.475)
Test_Point#3 [mm]
  round 2.5 hole 0.95: 1(-0.923,0.4)
Test_Point#4 [mm]
  round 2.5 hole 0.95: 1(-1.302,-0.675)
Test_Point#5 [mm]
  round 2.5 hole 0.95: 1(-1.127,-0.05)
Test_Point#6 [mm]
  round 2.5 hole 0.95: 1(-0.954,-0.1)
Test_Point#7 [mm]
  round 2.5 hole 0.95: 1(-0.625,-0.35)
Test_Point#8 [mm]
  round 2.5 hole 0.95: 1(-0.7,0.25)
Test_Point#9 [mm]
  round 2.5 hole 0.95: 1(-0.825,-0.625)
Test_Point#10 [mm]
  round 2.5 hole 0.95: 1(0,0)
TO-247-3(BEND2) [mm] "TO-247-3(BEND2)"
  round 1.524 hole 7.5: 0(0,0)
  oval 3x4 hole 1.8: 1(-5.5,-19.5) 2(0,-19.5) 3(5.5,-19.5)
  silkscreen extent -2.79,-22.22 2.71,-17.02, body extent -7.75,-19.9 7.75,5.5, height 1.9
US1G_SMA [mm]
  rect 2.5x1.7 smd paste+0 mask+0: 1(-2,0) 2(2,0)
  silkscreen extent -3.92,-1.46 2.3,1.46, body extent -2.6,-1.3 2.6,1.3, height 2.4
WE-PD2_1054#1 [mm] "SMD Power Inductor, 2-Leads, body 10x9mm"
  rect 3.75x9.5 smd: 1(-1273.125,-1270) 2(-1266.875,-1270)
  silkscreen extent -1275.62,-1270.12 -1275.37,-1269.88, body extent -1275.04,-1274.5 -1264.96,-1265.5, height 5.43
WE-PD2_1054#2 [mm] "SMD Power Inductor, 2-Leads, body 10x9mm"
  rect 3.75x9.5 smd: 1(-3.125,0) 2(3.125,0)
  silkscreen extent -5.62,-0.12 -5.37,0.12, body extent -5.04,-4.5 5.04,4.5, height 5.43
WE-PD2_7850 [mm] "SMD Power Inductor, 2-Leads, body 7.8x7mm"
  rect 3x7.5 smd: 1(-2.5,0) 2(2.5,0)
  silkscreen extent -4.59,-0.12 -4.34,0.12, body extent -3.81,-3.5 3.81,3.5, height 4.95
"Z121578672 77G" [mm] "Z121578672 77G"
  round 3 hole 1.5: 1(-26.035,-9.906) 1(-25.908,10.033) 2(26.035,-10.033) 2(26.035,10.033)
  body extent -28.5,-14.5 28.5,14.5, height 47.01

## Part data
C1 C3 C5 C6 C7 C8 C10 C11: library part CAP_POL_LOW_IMP
C2 C14 C20 C25 C26 C31 C42 C51 C60 C65 C66 C71 C72 C82 C83 C91: library part CAP-NON-POLAR, "0.1uF X7R"
C4 C21 C27 C43 C61 C67 C73 C84: library part CAP-NON-POLAR, "0.01uF X7R"
C9 C13 C22 C24 C28 C30 C46 C49 C62 C64 C68 C70 C75 C78 C85 C90: library part CAP_POL_SMD
C12 C23 C29 C32 C33 C34 C35 C36 C37 C38 C39 C40 C41 C44 C45 C47 C48 C50 C52 C53 C54 C55 C56 C57 C58 C59 C63 C69 C76 C77 C79 C80 C86 C87 C88 C93 C94 C98 C101 C102 C105 C107 C108 C110: library part CAP-NON-POLAR
C15: library part CAP-NON-POLAR, "4.7uF_630V   CBB21"
C74 C81 C89 C97 C99 C100 C103 C104 C106 C109: library part CAP-POLAR
D15: library part SS36_Schottky
J1 J2 J3 J4 J5: library part Klema_15_A, "18 * 18MM 180A PCB High Current Solder Terminal Copper Terminal Fastener M8 Nut"
J6 J7 J8 J9 J11 J12: library part Klema_15_A
K1 K2: library part Relay, "5-1000V 30A DC Contactor Power Relay SEV30ADXL Coil 12V"
L1: library part CMP-0227-00501-2, Ambient Temperature Range High=85°C, Ambient Temperature Range Low=-40°C, Current Rating=620mA, DC Resistance (DCR)=500mΩ, Inductance=270µH, Max Operating Temperature=125°C, Self Resonant Frequency=4MHz, Height=5.4mm, Length=9mm, Min Operating Temperature=-40°C, NexarPartId=24533346, Packaging=Digi-Reel®, RoHS=Compliant, Width=10mm
L2: library part Drossel_Synphaze
L4 L5: library part 744776122, Case/Size Code=1054, DC Resistance=0.051Ω, DC Resistance Max=0.1Ω, Inductance=22µH, Manufacturer="Wurth Elektronik", Operating Temperature Max=125°C, Operating Temperature Min=-40°C, Rated Current=2.04A, Saturation Current=2.07A, Self Resonant Frequency=16MHz, Category="Unshielded Power Inductors", ComponentLink1Description="Website Link", ComponentLink1URL=https://www.we-online.com/redexpert/article/744776122?ad, ComponentLink2Description="Datasheet Link", ComponentLink2URL=https://www.we-online.com/redexpert/spec/744776122?ad, Height=5.4mm, Length=10mm, Manufacturer Part Number=744776122, Match Code=WE-PD2, Mount="Surface Mount", Packaging="Tape and Reel", Width=9mm, Simulation ModelName=1054_744776122_22u, Simulation ModelText=".subckt 1054_744776122_22u 1 2 / Rp 1 2 22000 / Cp 1 2 4.3p / Rs 1 N3 0.0511 / L1 N3 2 22u / .ends 1054_744776122_22u", Simulation PortMap=(1:1),(2:2)
L7 L8: library part 74477530, Case/Size Code=7850, DC Resistance=2.78Ω, DC Resistance Max=3.3Ω, Inductance=1000µH, Manufacturer="Wurth Elektronik", Operating Temperature Max=125°C, Operating Temperature Min=-40°C, Rated Current=0.3A, Self Resonant Frequency=2.4MHz, Category="Unshielded Power Inductors", ComponentLink1Description="Website Link", ComponentLink1URL=https://www.we-online.com/redexpert/article/74477530?ad, ComponentLink2Description="Datasheet Link", ComponentLink2URL=https://www.we-online.com/redexpert/spec/74477530?ad, Height=4.95mm, Length=7.8mm, Manufacturer Part Number=74477530, Match Code=WE-PD2, Mount="Surface Mount", Packaging="Tape and Reel", Saturation Current=0.3A, Width=7mm, Simulation ModelName=7850_74477530_1m, Simulation ModelText=".subckt 7850_74477530_1m 1 2 / Rp 1 2 187304.915771 / Cp 1 2 4.36976277949p / Rs 1 N3 3.3 / L1 N3 2 1000u / .ends 7850_74477530_1m", Simulation PortMap=(1:1),(2:2)
P1: "WR-TBL Series 3055 PCB Header Horizontal Entry with Plastic Latches, THT, pitch 5.08mm, 2p", Manufacturer="Wurth Elektronik", Operating Temperature Max=105°C, Operating Temperature Min=-40°C, Rated Current=16A, Working Voltage=300V, Application=Pluggable, Category="Terminal Blocks", ComponentLink1Description="Website Link", ComponentLink1URL=https://www.we-online.com/redexpert/article/691305540002?ad, ComponentLink2Description="Datasheet Link", ComponentLink2URL=https://www.we-online.com/redexpert/spec/691305540002?ad, Manufacturer Part Number=691305540002, Match Code=WR-TBL, Modularity=No, Mount="Through Hole", Number of Pins=2, Number of Rows=1, Orientation=Horizontal, Packaging=Box, Pitch=5.08mm
P2: "WR-BHD Male Box Header, THT Straight, pitch 2.54 mm, 2 Rows, 26 Pins", Contact Resistance="20 mΩ", Insulation Resistance="1000 MΩ", Manufacturer="Wurth Elektronik", Max Operating Temperature="105 °C", Min Operating Temperature="-40 °C", Rated Current="3 A", Withstanding Voltage="500 V", Working Voltage="250 V", Category="Wire-to-Board Connector", ComponentLink1Description="Website Link", ComponentLink1URL=https://www.we-online.com/redexpert/article/61202621621?ad, ComponentLink2Description="Datasheet Link", ComponentLink2URL=https://www.we-online.com/redexpert/spec/61202621621?ad, Connectors.Match Code=WR-BHD, Gender=Male, Height="9.1 mm", Length="40.68 mm", Manufacturer Part Number=61202621621, Mount="Through Hole", Number of Pins=26, Number of Rows=2, Orientation=Straight, Packaging=Tray, Pitch="2.54 mm", Width="9.1 mm"
R1 R2 R3 R4 R6 R7 R8 R9 R10 R11 R12 R13 R14 R15 R16 R17 R18 R19 R20 R21 R22 R23 R24 R25 R26 R27 R28 R29 R30 R31 R32 R33 R34 R35 R36 R37 R38 R39 R40 R41 R42 R43 R44 R45 R46 R47 R48 R49 R50 R51 R52 R53 R54 R55 R56 R57 R58 R59 R60 R61 R62 R63 R64 R65 R66 R67 R68 R69 R70 R71 R72 R73 R74 R75 R76 R77 R78 R79 R80 R81 R82 R83 R84 R85 R86 R87 R88 R89 R90 R91 R92 R93 R94 R95 R96 R97 R98 R99 R100 R101 R102 R103 R104 R105: library part RES-CONST
R5: library part RES-CONST, "100W RX24 Aluminum Power Metal Shell Case Wirewound Resistor 100Omh"
TP2 TP3 TP4 TP5 TP6 TP7 TP8 TP9 TP10 TP11 TP12 TP13 TP14 TP15 TP16 TP17 TP18 TP19 TP20 TP21: library part TP_PCB?, "Test_Point"
U15 U17: library part AMC1311
U24: library part LM2576D2T-005G
U26 U29 U30: library part AMS1117

## Via types
v1: diameter 0.9, hole 0.4, Top Layer 1 to Bottom Layer 1, tented both sides, 41 vias
v2: diameter 1.27, hole 0.711, Top Layer 1 to Bottom Layer 1, 21 vias
v3: diameter 0.7, hole 0.3, Top Layer 1 to Bottom Layer 1, 4 vias
v4: diameter 0.9, hole 0.4, Top Layer 1 to Bottom Layer 1, 2 vias
v5: diameter 0.8, hole 0.3, Top Layer 1 to Bottom Layer 1, 2 vias

## Nets (pads, with @x,y where several pads share a name; then routed paths per layer and width w, separated by ;. In a path a pad name is that pad's centre, name@x,y a point inside that pad or via, vN(x,y) a via of type N, cw(c..) or ccw(c..) an arc to the next point about the centre after c; other vN are vias at no path point)
+3V3: C40.2 C41.2 C44.2 C45.2 C86.2 C89.1 C93.2 C94.2 U8.20 U14.5 U15.8 U16.5 U17.8 U26.2 | length 335.4
  Top Layer 1 w0.5: v2(69.375,205.7) 69.522,205.847 70.532,205.847 70.825,206.14 70.825,206.625 C93.2@71,206.8 ; C93.2@71,206.775 C94.2@71,208.325 ; C94.2@71,208.35 71,209.332 71.293,209.625 U8.20@71.85,209.625
  Top Layer 1 w1: C89.1@28.9,178.5 28.975,178.425 v2(28.975,173.725) ; v2(81.6,246.575) 86.148,242.027 86.148,240.977 v2(86.2,240.925)
  Bottom Layer w1: v2(34.375,171.95) 56.35,171.95 60.875,167.425 60.875,111.675 52.925,103.725 v3(43.925,103.725) 47.125,100.525 v3(47.125,98) ; v3(48.135,202.776) 48.135,198.79 49.874,197.051 v3(51.335,197.051) 59.65,205.366 59.65,224.775 70.524,235.649 70.674,235.649 v2(81.6,246.575) ; v2(69.35,182.475) 69.363,182.487 69.363,205.688 v2(69.375,205.7) 69.35,205.725 69.35,224.25 85.89,240.79 85.992,240.79 86.127,240.925 v2(86.2,240.925)
  Bottom Layer 1 w0.6: U17.8@46.19,92.551 46.19,93.151 47.125,94.086 v3(47.125,98) ; v3(48.135,202.776) 48.135,206.69 49.07,207.625 U15.8@49.07,208.225
  Bottom Layer 1 w0.8: U16.5@42.825,102.475 42.825,102.625 v3(43.925,103.725) ; v3(51.335,197.051) 52.435,198.151 U14.5@52.435,198.301
  Bottom Layer 1 w1: C86.2@26.225,173.725 27.25,173.725 v2(28.975,173.725) 29.048,173.725 29.122,173.799 U26.2@34.375,173.799 ; U26.2@34.375,167.699 v2(34.375,171.95) U26.2@34.375,173.799 ; v2(69.35,182.475) 69.298,182.423 69.298,181.848 66.8,179.35 36.75,179.35 34.375,176.975 U26.2@34.375,173.799
+5: C88.2 U26.3 | length 3.3
  Bottom Layer 1 w1: C88.2@29.9,169.475 31.45,169.475 32.075,168.85 U26.3@32.075,168.022
+5V: C33.2 C36.2 C38.2 C39.2 C98.2 C100.1 L7.2 U11.2 U12.2 | length 193.5
  Top Layer 1 w0.9: L7.2@24.979,169.549 25.153,169.375 27.7,169.375 v2(27.8,169.475)
  Bottom Layer w0.9: v2(27.8,169.475) 33.7,175.375 40.4,175.375 ; v2@43.169,211.436 40.4,208.667 40.4,175.375 ; v2@43.17,211.436 43.535,211.801 v2(43.635,211.801) ; v2(51.625,88.975) 51.696,89.046 52.346,89.046 63.425,100.125 63.425,170.525 58.575,175.375 40.4,175.375
  Bottom Layer 1 w0.9: C98.2@26.2,169.55 27.725,169.55 v2(27.8,169.475) ; U12.2@39.825,88.37 40.001,88.37 40.606,88.975 C36.2@48.753,88.975 C39.2@50.15,88.975 51.6,88.975 51.625,88.95 v2(51.625,88.975) ; v2(43.635,211.801) 43.635,211.826 43.66,211.801 C38.2@45.11,211.801 C33.2@46.507,211.801 54.654,211.801 55.259,212.406 U11.2@55.435,212.406
+5V_1: C104.1 C105.2 L8.2
+8VDC: C80.2 C97.1 C102.2 C103.1 C108.2 L5.2 U29.3 U30.3 | length 79.6
  Top Layer 1 w0.9: L5.2@13.893,143.387 13.893,155.144 11.725,157.312 v2(11.725,164.55) 27.575,164.55 28.315,165.29 v2@40.24,165.29 ; v2(40.325,165.375) 42.325,165.375 43.775,166.825 43.775,169.275 42.775,169.275 42.175,169.875 42.175,170.525 41.575,171.125 C102.2@40.425,171.125 ; v2@40.338,165.388 40.338,166.662 C108.2@40.35,166.675 ; C103.1@43.725,169.325 43.8,169.4 C97.1@43.8,178.5
  Bottom Layer 1 w0.9: U29.3@11.71,167.605 11.71,164.565 v2(11.725,164.55) 11.775,164.5 C80.2@11.775,162.75 ; v2(40.325,165.375) 40.338,165.388 40.338,167.663 U30.3@40.35,167.675